# Altium PCB iMX6 Rex_V1I1_PCB.PcbDoc (part 6 of 8)
Units mm, origin at the board's own origin, x right, y up, seen from the top; angles counter-clockwise.
Board outline 70 x 40 mm, 12 copper layers (L1, L2, L3, L4, L5 (PWR), L6 (PWR), L7 (PWR), L8 (PWR), L9, L10, L11, L12), stack 1.566 mm thick; 473 components, 409 nets, 2294 pads, 1880 vias.
Unrouted connection lines stored in the file: 7.
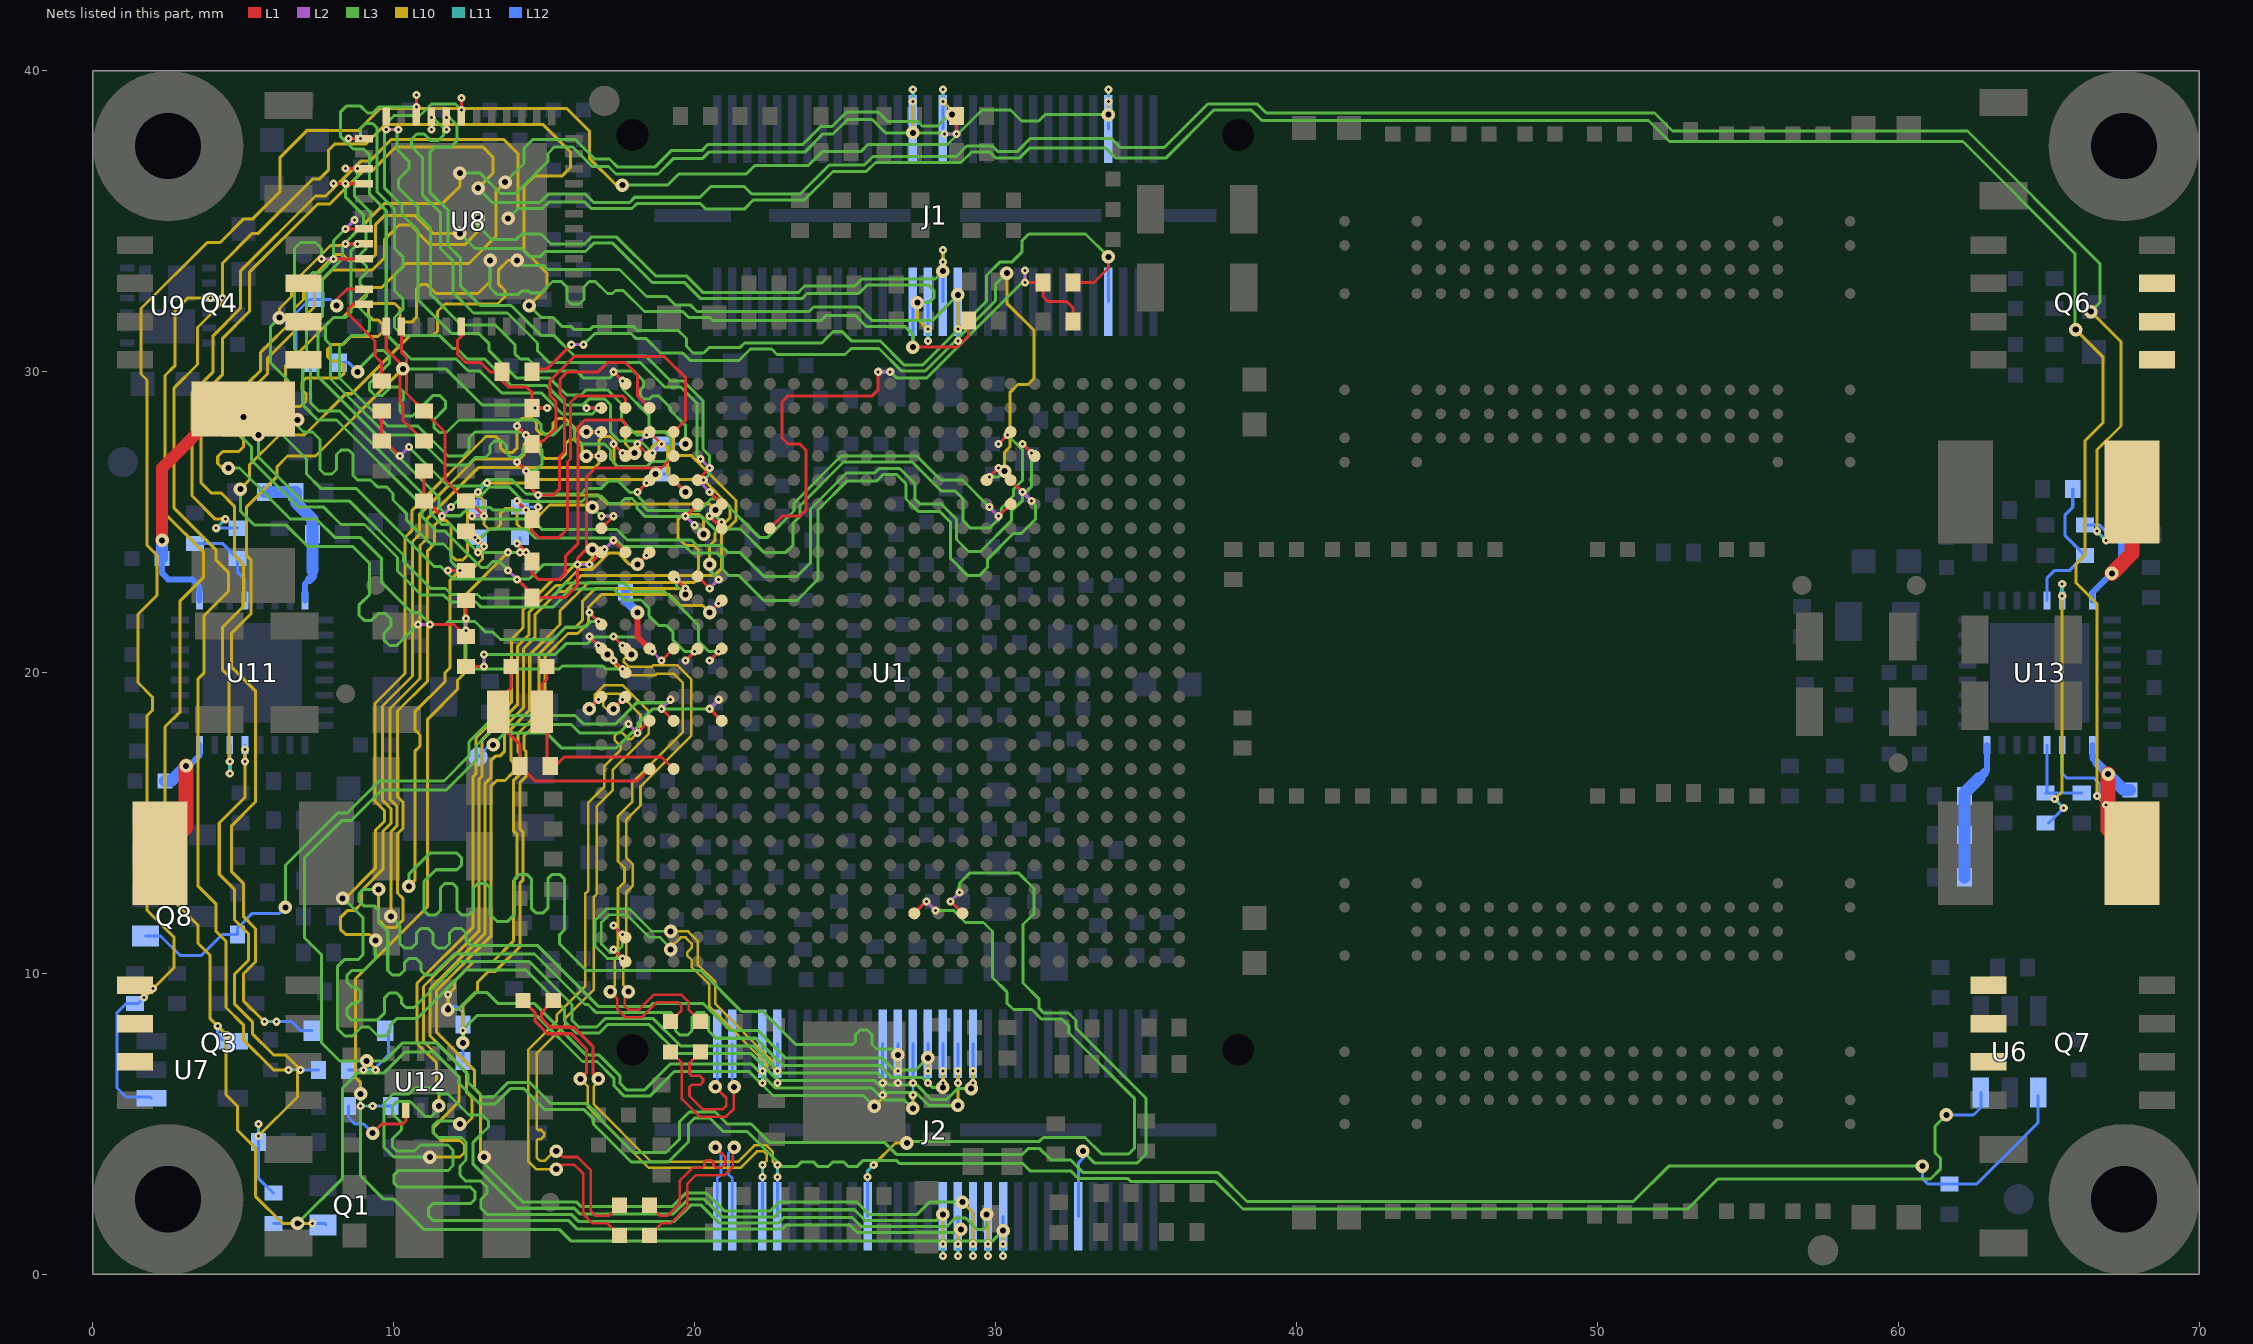
[diagram p16: the nets of this part, all layers, seen from the top]

## Via types
v1: diameter 0.45, hole 0.2, L1 to L12, tented both sides, 761 vias
v2: diameter 0.27, hole 0.1, L1 to L2, 305 vias
v3: diameter 0.27, hole 0.1, L2 to L3, 290 vias
v4: diameter 0.45, hole 0.2, L3 to L10, 196 vias
v5: diameter 0.27, hole 0.1, L11 to L12, 185 vias
v6: diameter 0.27, hole 0.1, L10 to L11, 142 vias
v7: diameter 0.45, hole 0.2, L3 to L10, tented both sides, 1 vias

## Nets (pads, with @x,y where several pads share a name; then routed paths per layer and width w, separated by ;. In a path a pad name is that pad's centre, name@x,y a point inside that pad or via, vN(x,y) a via of type N, cw(c..) or ccw(c..) an arc to the next point about the centre after c; other vN are vias at no path point) (continued)
PCIE_RX_N: J2.52 U1.B1 | length 14.1
  L1 w0.101: v2(17.3,10.8) U1.B1@17.7,10.4
  L2 w0.1: v2(17.3,10.8) v3(17.6,10.5)
  L3 w0.085: v3(17.6,10.5) 17.1,10.5 16.7,10.9 16.7,11.783 17.067,12.15 17.833,12.15 18.583,11.4 v4(19.2,11.4)
  L10 w0.085: v4(19.2,11.4) 19.783,11.4 20.103,11.08 20.103,10.3 20.688,9.715 20.688,8.993 22.612,7.068 22.612,6.895 v6(22.75,6.758)
  L11 w0.1: v5(22.75,6.358) v6(22.75,6.758)
  L12 w0.101: v5(22.75,6.358) J2.52@22.75,7.67
PCIE_RX_P: J2.54 U1.B2 | length 14.1
  L1 w0.101: v2(17.3,11.6) U1.B2@17.7,11.2
  L2 w0.1: v2(17.3,11.6) v3(17.6,11.3)
  L3 w0.085: v3(17.6,11.3) 17.6,10.914 17.386,10.7 17.183,10.7 16.9,10.983 16.9,11.7 17.15,11.95 17.75,11.95 18.5,11.2 18.85,11.2 19.2,10.85 v4(19.2,10.8)
  L10 w0.085: v4(19.2,10.8) 19.2,10.859 19.541,11.2 19.7,11.2 19.9,11 19.9,10.853 19.75,10.703 19.75,10.6 19.903,10.447 19.903,10.217 20.488,9.632 20.488,8.91 22.412,6.985 22.412,6.92 v6(22.25,6.758)
  L11 w0.1: v5@22.25,6.358 v6(22.25,6.758)
  L12 w0.101: v5@22.25,6.358 J2.54@22.25,7.67
  other v5: 22.25,6.358
PCIE_TX_N: C63.2 J2.51 | length 14.2
  L1 w0.101: C63.2@15.3,9.1 14.915,8.715 14.915,8.5 15.2,8.215 15.985,8.215 16.615,7.585 16.615,6.685 v1(16.8,6.5)
  L10 w0.085: v1(16.8,6.5) 16.8,6.4 16.641,6.241 16.641,5.659 18.557,3.743 21.438,3.743 21.984,4.289 22.381,4.289 22.6,4.07 22.6,3.743 22.7,3.643 v6(22.75,3.643)
  L11 w0.1: v5(22.75,3.243) v6(22.75,3.643)
  L12 w0.101: J2.51@22.75,1.93 v5(22.75,3.243)
PCIE_TX_P: C65.2 J2.53 | length 14.2
  L1 w0.101: C65.2@14.3,9.1 14.7,8.7 14.7,8.411 15.111,8 15.896,8 16.4,7.496 16.4,6.7 v1(16.2,6.5)
  L10 w0.085: v1(16.2,6.5) 16.441,6.259 16.441,5.576 18.475,3.542 21.52,3.542 22.066,4.089 22.299,4.089 22.4,3.987 22.4,3.793 v6(22.25,3.643)
  L11 w0.1: v5(22.25,3.243) v6(22.25,3.643)
  L12 w0.101: J2.53@22.25,1.93 v5(22.25,3.243)
PCIE_WAKE: J2.39 U1.P3 | length 24.3
  L1 w0.1: U1.P3@27.3,12 v2(27.7,12.4)
  L2 w0.1: v2(27.7,12.4) v3(28,12.1)
  L3 w0.1: v4(27.05,4.368) 27.107,4.425 31.455,4.425 31.585,4.555 32.975,4.555 33.53,4 34.425,4 34.625,4.2 34.625,5.835 32.438,8.023 32.438,8.251 32.196,8.493 31.522,8.493 31.209,8.805 30.595,8.805 30.375,9.025 30.375,9.395 29.9,9.87 29.9,11.4 29.6,11.7 29,11.7 28.6,12.1 v3(28,12.1)
  L10 w0.1: v6(25.95,3.643) 26.676,4.368 v4(27.05,4.368)
  L11 w0.1: v5(25.75,3.243) 25.75,3.443 v6(25.95,3.643)
  L12 w0.1: J2.39@25.75,1.93 v5(25.75,3.243)
PHASE1_2V5: C230.1 L4.2 Q6.5 Q6.6 Q6.7 U13.16 | length 6.7
  L1 w0.5: v1(67.1,23.3) 67.769,23.969 L4.2@67.769,26
  L12 w0.2: U13.16@66.45,22.4 66.45,22.65 v1(67.1,23.3) ; 67.4,23.6 67.4,24.5 C230.1@67.5,24.6
  L12 w0.4: v1(67.1,23.3) 67.4,23.6 67.5,23.7 C230.1@67.5,24.6
PHASE1_3V3: C211.1 L1.2 Q3.5 Q3.6 Q3.7 U11.16 | length 5.1
  L1 w0.5: L1.2@2.231,14 3.1,14.869 v1(3.1,16.9)
  L12 w0.2: v1(3.1,16.9) 3.2,16.9 3.55,17.25 U11.16@3.55,17.6
  L12 w0.4: C211.1@2.4,16.4 2.6,16.4 v1(3.1,16.9)
PHASE2_1V5: C231.2 L5.1 Q7.5 Q7.6 Q7.7 U13.25 | length 5.1
  L1 w0.5: v1(66.975,16.625) 66.975,14.794 L5.1@67.769,14
  L12 w0.2: U13.25@66.45,17.6 66.45,17.15 66.6,17
  L12 w0.3: 66.6,17 v1(66.975,16.625)
  L12 w0.4: v1(66.975,16.625) 67.5,16.1 C231.2@67.7,16.1
PHASE2_1V375: C212.2 L2.1 Q4.5 Q4.6 Q4.7 U11.25 | length 8.9
  L1 w0.4: v1(2.3,24.4) 2.3,26.8 4.269,28.769 L2.1@5,28.769
  L12 w0.2: C212.2@2.3,23.8 2.3,23.3 2.5,23.1 3.3,23.1 3.55,22.85 U11.25@3.55,22.4
  L12 w0.4: C212.2@2.3,23.8 v1(2.3,24.4)
PMIC_ON_REQ: Q8.1 R73.1 U1.D11 | length 23.7
  L1 w0.1: v2(18.9,18.8) U1.D11@19.3,18.4
  L2 w0.1: v2(18.9,18.8) v3(19.2,19.1)
  L3 w0.1: v1(6.4,12.2) 6.4,13.6 8.13,15.33 8.447,15.33 9.517,16.4 11.666,16.4 12.5,17.234 12.5,17.7 13.375,18.575 16.025,18.575 16.3,18.3 17.375,18.3 18.075,19 19.1,19 v3(19.2,19.1)
  L12 w0.1: Q8.1@1.75,11.25 2.25,11.25 2.9,10.6 3.6,10.6 4.3,11.3 R73.1@4.8,11.3 4.8,11.5 5.3,12 6.2,12 v1(6.4,12.2)
PMIC_STBY_REQ: TP3.1 U1.F11 | length 10.2
  L1 w0.1: v2(20.5,18.8) U1.F11@20.9,18.4
  L2 w0.1: v2(20.5,18.8) v3(20.8,19.1)
  L3 w0.1: v1(13.3,17.6) 13.7,18 15.07,18 15.57,17.5 17.403,17.5 18.125,18.222 18.125,18.321 18.604,18.8 v2(20.5,18.8) v3(20.8,19.1)
  L12 w0.1: TP3.1@12.8,17.2 13.2,17.6 v1(13.3,17.6)
POK_1V5: R164.1 U13.14 | length 8.9
  L10 w0.1: v6(65.2,15.8) 65.45,16.05 v6(65.45,22.55)
  L11 w0.1: v6(65.2,15.8) v5(65.5,15.5) ; v6(65.45,22.55) v5(65.45,22.95)
  L12 w0.1: R164.1@65,15 v5(65.5,15.5) ; U13.14@65.45,22.4 v5(65.45,22.95)
POK_1V5_R: R154.1 R164.2 U13.28 | length 2.8
  L12 w0.1: U13.28@64.95,17.6 64.95,16.05 R164.2@64.9,16 R154.1@66.1,16
POK_1V375: R108.1 U13.27 | length 103.1
  L3 w0.1: v4(13.8,35.1) 14.125,35.425 14.938,35.425 15.163,35.65 16.337,35.65 16.562,35.425 17.921,35.425 18.096,35.6 20.18,35.6 20.375,35.405 21.649,35.405 21.949,35.705 23.645,35.705 24.595,36.655 25.707,36.655 26.007,36.955 28.855,36.955 29.2,37.3 29.817,37.3 30.017,37.1 30.786,37.1 31.116,37.43 33.67,37.43 34,37.1 35.655,37.1 37.255,38.7 38.5,38.7 38.85,38.35 51.7,38.35 52.4,37.65 62.15,37.65 65.875,33.925 65.875,31.425 v4(65.9,31.4)
  L10 w0.1: v6(4.4,25.1) 4.07,25.1 3.3,25.87 3.3,29.3 4,30 4,31.2 4.9,32.1 4.9,33.338 7.4,35.838 7.738,35.838 8.9,37 9.2,37 9.925,37.725 13.65,37.725 14.125,37.25 14.125,35.425 v4(13.8,35.1) ; v4(65.9,31.4) 66.8,30.5 66.8,28.3 66.2,27.7 66.2,23.9 65.9,23.6 65.9,23 66.6,22.3 v6(66.6,15.9)
  L11 w0.1: v5(4.1,24.8) v6(4.4,25.1) ; v6(66.6,15.9) v5(66.9,15.6)
  L12 w0.1: v5@4.2,24.8 R108.1@4.8,24.8 ; U13.27@65.45,17.6 65.45,16.65 65.6,16.5 66.5,16.5 66.7,16.3 66.7,15.8 v5(66.9,15.6)
POK_1V375_R: R108.2 R130.1 U11.28 | length 3.1
  L12 w0.1: R130.1@3.4,24.3 4.3,24.3 R108.2@4.8,23.8 4.8,23.35 5.05,23.1 U11.28@5.05,22.4
POK_2V5: R163.1 U11.14 | length 100.4
  L3 w0.1: v4(12.8,36.1) 13.275,35.625 14.855,35.625 15.13,35.9 16.37,35.9 16.645,35.625 17.838,35.625 18.013,35.8 20.177,35.8 20.532,36.155 21.65,36.155 21.9,35.905 23.505,35.905 24.475,36.875 25.644,36.875 25.924,37.155 28.7,37.155 29.045,37.5 29.9,37.5 30.085,37.315 30.718,37.315 31.153,37.75 33.85,37.75 34.145,37.455 35.61,37.455 37.055,38.9 38.7,38.9 39,38.6 51.9,38.6 52.5,38 62.3,38 66.7,33.6 66.7,32.3 v4(66.4,32)
  L10 w0.1: v6(4.55,17.05) 4.525,17.075 4.525,19.875 4.3,20.1 4.3,21.5 5,22.2 5,23.601 4.7,23.901 4.7,25.53 4.255,25.975 3.925,25.975 3.6,26.3 3.6,29.2 4.3,29.9 4.3,31.1 5.2,32 5.2,33.305 7.47,35.575 7.875,35.575 9,36.7 9.3,36.7 10.075,37.475 12.955,37.475 13.3,37.13 13.3,36.6 v4(12.8,36.1) ; v4(66.4,32) 67.4,31 67.4,28.2 66.6,27.4 v6(66.6,24.7)
  L11 w0.1: v5(4.55,16.65) v6(4.55,17.05) ; v6(66.6,24.7) v5(66.9,24.4)
  L12 w0.1: v5(4.55,16.65) U11.14@4.55,17.6 ; R163.1@66.2,24.9 66.7,24.9 66.9,24.7 v5(66.9,24.4)
POK_2V5_R: R153.1 R163.2 U13.13 | length 4.9
  L12 w0.1: U13.13@64.95,22.4 64.95,23.15 65.203,23.403 65.703,23.403 R163.2@66.2,23.9 65.55,24.55 65.55,25.25 65.8,25.5 R153.1@65.8,26.1
POK_3V0_SNVS: R93.1 U12.7 | length 3
  L1 w0.1: v1(9.3,4.7) 9.6,5 10.3,5 10.4,5.1 U12.7@10.4,5.45
  L12 w0.1: R93.1@8.5,5.6 8.5,5.2 8.7,5 9,5 v1(9.3,4.7)
POK_3V3: Q1.1 R107.1 U6.3 U7.4 U9.9 | length 107.3
  L3 w0.1: v4(6.8,1.7) 8.3,3.2 8.3,6.2 8.8,6.7 9.683,6.7 10.383,7.4 11.33,7.4 12.175,6.555 12.175,6.345 12.85,5.67 13.37,5.67 13.875,6.175 14.325,6.175 15.025,5.475 16.33,5.475 16.63,5.175 16.63,5 17.885,3.745 19.128,3.745 19.8,4.417 19.8,5 20,5.2 20.5,5.2 20.95,4.75 21.744,4.75 22.901,3.593 23.405,3.593 23.555,3.743 23.945,3.743 24.095,3.593 24.445,3.593 24.595,3.743 24.945,3.743 25.095,3.593 25.405,3.593 25.606,3.794 ; 25.607,3.793 26.7,3.793 26.8,3.693 30.894,3.693 31.145,3.443 32.5,3.443 32.76,3.183 34.4,3.183 34.5,3.083 37.317,3.083 38.225,2.175 53.005,2.175 54.005,3.175 54.2,3.175 61.075,3.175 61.4,3.5 61.4,3.87 61.225,4.045 61.225,4.925 v1(61.6,5.3)
  L10 w0.1: v6(3.91,32.45) 3.15,32.45 2.725,32.025 2.725,30.2 2.4,29.875 2.4,25.283 3.683,24 3.683,23.174 2.9,22.391 2.9,18.7 2.4,18.2 2.4,12.7 3.5,11.6 3.5,11 3.9,10.6 3.9,8.5 v6(4.45,7.95) 4.425,7.925 4.425,5.975 4.8,5.6 4.8,4.8 5.4,4.2 5.4,2.6 6.3,1.7 v4(6.8,1.7) v6(7.3,1.7)
  L11 w0.1: v6(3.91,32.45) v5(4.31,32.45) ; v5(4.15,8.25) v6(4.45,7.95) ; v5(6.9,1.7) v6(7.3,1.7)
  L12 w0.1: U9.9@3.86,32.45 v5(4.31,32.45) ; v5(4.15,8.25) 4.15,7.95 U7.4@4.3,7.8 ; R107.1@6,1.7 7.7,1.7 Q1.1@7.75,1.65 ; v1(61.6,5.3) 62.5,5.3 62.75,5.55 U6.3@62.75,6.05
POK_3V3_R: R107.2 R129.1 U11.13 | length 19.3
  L10 w0.1: v6(5.05,17.45) 5.05,15.85 4.2,15 4.2,13.3 4.7,12.8 4.7,11.8 5.175,11.325 5.175,10.445 4.7,9.97 4.7,8.997 5.3,8.397 5.3,8 6,7.3 6.403,7.3 6.8,6.903 6.8,5.9 v6(5.5,4.6)
  L11 w0.1: v5(5.05,17.05) v6(5.05,17.45) ; v6(5.5,4.6) v5(5.5,5)
  L12 w0.1: v5(5.05,17.05) U11.13@5.05,17.6 ; v5(5.5,5) R129.1@5.5,4.4 5.5,3.2 R107.2@6,2.7
POR_BN: D1.1 R60.1 R70.1 U1.C11 U6.1 | length 88.3
  L1 w0.1: v2(18.1,18) U1.C11@18.5,18.4
  L2 w0.1: v3(17.8,18.3) v2(18.1,18)
  L3 w0.1: v3(17.8,18.3) 17.5,18 16.175,18 15.9,18.275 13.445,18.275 12.75,17.58 12.75,17.101 11.749,16.1 9.6,16.1 8.58,15.08 8.267,15.08 7.025,13.838 7.025,11.2 7.6,10.625 7.6,7.7 8.2,7.1 v4(9.1,7.1) 9.7,7.1 10.3,7.7 11.413,7.7 12.475,6.638 12.475,6.378 12.953,5.9 13.317,5.9 13.792,6.375 14.525,6.375 15.225,5.675 16.413,5.675 16.83,5.258 16.83,5.183 17.963,4.05 19.05,4.05 19.5,4.5 19.5,5.083 19.817,5.4 20.683,5.4 21.083,5 21.877,5 22.5,4.377 26.316,4.377 26.7,3.993 30.893,3.993 31.093,4.193 31.455,4.193 31.848,3.8 32.5,3.8 32.918,3.383 37.4,3.383 38.358,2.425 51.195,2.425 52.37,3.6 v1(60.8,3.6)
  L10 w0.1: v4(9.1,7.1) v6(9.4,6.8)
  L11 w0.1: v5(9,6.8) v6(9.4,6.8)
  L12 w0.1: R70.1@8.5,6.8 v5(9,6.8) 9.325,6.8 9.819,7.294 D1.1@9.819,8.1 ; v1(60.8,3.6) 60.8,3.4 60.8,3.2 61,3 61.2,3 R60.1@61.7,3 62.6,3 64.65,5.05 U6.1@64.65,5.95
REFIN2_1V5: R134.1 R135.1 R158.2 U13.32 | length 4.7
  L12 w0.2: 62.875,16.675 62.95,16.75 U13.32@62.95,17.6
  L12 w0.3: 62.7,16.5 62.875,16.675
  L12 w0.4: R158.2@62.2,13.2 R134.1@62.2,14.6 R135.1@62.2,15.9 62.2,16 62.7,16.5
REFIN2_1V375: R119.1 R120.2 R136.2 U11.32 | length 5.5
  L12 w0.2: U11.32@7.05,22.4 7.05,22.95 7.2,23.1 ; R120.2@7.3,24.6 7.3,25.1
  L12 w0.3: 7.2,23.1 7.3,23.2 7.3,23.4
  L12 w0.4: R136.2@5.7,26 R119.1@6.75,26 6.75,25.65 7.3,25.1 R120.2@7.3,24.6 7.3,23.4
RGMII_INT: R88.2 R89.1 U1.W22 U8.38 | length 35
  L1 w0.1: U8.38@10.25,31.51 10.25,30.65 10.425,30.475 10.425,29.275 R89.1@11,28.7 11.7,28 11.7,26.4 R88.2@12.4,25.7 12.5,25.7 v2(13,25.2) ; v2(30.9,27.6) U1.W22@31.3,27.2
  L2 w0.1: v3(12.6,25.2) v2(13,25.2) ; v2(30.9,27.6) v3(31.2,27.3)
  L3 w0.1: v3(12.6,25.2) 12.7,25.1 14.583,25.1 14.933,24.75 17.42,24.75 17.755,24.415 19.885,24.415 20.075,24.225 20.875,24.225 21.1,24 21.5,24 22.3,23.2 23.4,23.2 23.85,23.65 23.85,25.436 25.05,26.636 25.986,26.636 26.135,26.785 26.815,26.785 27.325,26.275 27.325,25.775 27.5,25.6 28.2,25.6 28.7,25.1 28.7,24.425 29.1,24.025 29.5,24.025 30.525,25.05 30.525,25.355 30.9,25.73 30.9,25.892 31.2,26.193 v3(31.2,27.3)
RGMII_INT_R: R88.1 U1.V21 | length 29.2
  L1 w0.1: R88.1@12.4,24.7 12.5,24.7 v2(13,24.2) ; U1.V21@30.5,26.4 v2(30.9,26)
  L2 w0.1: v3(12.7,24.5) v2(13,24.2) ; v2(30.9,26) v3(31.2,25.7)
  L3 w0.1: v3(12.7,24.5) 12.925,24.5 13.2,24.775 14.4,24.775 14.7,24.475 17.325,24.475 17.615,24.185 19.7,24.185 19.91,23.975 20.755,23.975 20.925,23.805 20.925,23.445 21.145,23.225 21.475,23.225 22.3,22.4 23.4,22.4 24.1,23.1 24.1,25.403 25.072,26.375 26.058,26.375 26.268,26.585 26.718,26.585 27.025,26.278 27.025,25.775 27.45,25.35 28.153,25.35 28.5,25.003 28.5,23.8 29.075,23.225 29.455,23.225 29.725,23.495 29.725,23.755 30.6,24.63 30.861,24.63 31.325,25.095 31.325,25.575 v3(31.2,25.7)
RGMII_MDC: R85.1 R87.1 U1.V20 | length 26.8
  L1 w0.1: R85.1@9.6,28.8 R85.1@9.6,28.7 R87.1@9.6,27.7 9.7,27.7 v2(10.2,27.2) ; v2(30.1,25.2) U1.V20@30.5,25.6
  L2 w0.1: v2(10.2,27.2) v3(10.5,27.5) ; v3(29.8,25.5) v2(30.1,25.2)
  L3 w0.1: v3(10.5,27.5) 11.8,26.2 12.875,26.2 13.1,26.425 13.908,26.425 14.398,25.935 16.222,25.935 16.412,26.125 16.895,26.125 17.145,26.375 17.455,26.375 17.845,25.985 18.001,25.985 18.285,25.701 18.285,25.545 18.445,25.385 20.155,25.385 20.545,25.775 20.875,25.775 22.15,24.5 22.425,24.5 23.3,25.375 23.3,25.633 24.867,27.2 27.383,27.2 28.183,26.4 28.9,26.4 v3(29.8,25.5)
RGMII_MDIO: R86.1 R162.1 U1.V23 | length 29.7
  L1 w0.1: R86.1@11,26.7 11,25.8 v2(11.6,25.2) ; v2(30.1,27.6) U1.V23@30.5,28
  L2 w0.1: v2(11.6,25.2) v3(11.9,25.5) ; v2(30.1,27.6) v3(30.4,27.9)
  L3 w0.1: v3(11.9,25.5) 12.3,25.9 12.908,25.9 13.183,26.175 13.825,26.175 14.315,25.685 16.255,25.685 16.445,25.875 16.895,25.875 17.145,25.625 17.522,25.625 17.682,25.785 17.918,25.785 18.085,25.618 18.085,25.463 18.362,25.185 20.245,25.185 20.715,24.715 21.018,24.715 21.078,24.775 21.525,24.775 22.3,24 23.03,24 23.275,24.245 23.275,24.975 23.5,25.2 23.5,25.55 24.95,27 27.23,27 28.2,26.03 28.67,26.03 28.925,25.775 28.925,25.045 29.17,24.8 29.8,24.8 30.2,25.2 30.2,25.475 30.6,25.875 30.6,26.1 30.9,26.4 30.9,27.4 v3(30.4,27.9)
RGMII_R_MDC: R85.2 U8.36 | length 3.4
  L1 w0.1: U8.36@9.01,32.25 8.65,32.25 8.5,32.1 8.5,31.9 9.375,31.025 9.375,30.525 9.6,30.3 R85.2@9.6,29.7
RGMII_R_MDIO: R86.2 U8.37 | length 4.3
  L1 w0.1: U8.37@9.75,31.51 9.75,30.75 10.2,30.3 10.2,29 10.3,28.9 10.3,28.4 R86.2@11,27.7
RGMII_R_RXCLK: R83.2 R101.2 U8.35 | length 4.8
  L1 w0.1: v1(8.1,32.2) 8.1,32.4 8.45,32.75 U8.35@9.01,32.75
  L12 w0.1: R83.2@7.2,30.3 7.1,30.3 6.75,30.65 6.75,31.95 7.2,32.4 R101.2@7.4,32.4 7.9,32.4 v1(8.1,32.2)
RGMII_R_TXCLK: R35.1 U1.D21 | length 1.6
  L1 w0.1: U1.D21@19.3,26.4 v1(19.7,26)
  L12 w0.1: R35.1@18.9,26.6 19.1,26.6 v1(19.7,26)
RGMII_RSTN: D1.2 R65.2 R75.1 U8.42 | length 38.3
  L1 w0.1: U8.42@12.25,31.51 12.25,31.18 12.125,31.055 12.125,30.575 12.4,30.3 12.9,30.3 13.2,30 R65.2@13.6,30 13.6,29.7 13.8,29.5 14.4,29.5 14.6,29.3 R75.1@14.6,28.9 ; R75.1@14.6,28.8 v2(15.1,28.8)
  L2 w0.1: v3(14.7,28.8) v2(15.1,28.8)
  L3 w0.1: v4(10.3,30.1) 11.73,30.1 12.93,28.9 14.6,28.9 v3(14.7,28.8)
  L10 w0.1: v6(5.7,8.4) 5,9.1 5,9.987 5.4,10.387 5.4,11.5 5,11.9 5,13 4.6,13.4 4.6,14.9 5.4,15.7 5.4,19.4 4.6,20.2 4.6,21.3 5.25,21.95 5.25,23.75 5.1,23.9 5.1,25.5 6.125,26.525 6.125,26.855 6.47,27.2 7.4,27.2 v4(10.3,30.1)
  L11 w0.1: v6(5.7,8.4) v5(6.1,8.4)
  L12 w0.1: v5(6.1,8.4) 6.6,8.4 6.9,8.1 D1.2@7.281,8.1
RGMII_RSTN_R: R65.1 U1.U21 | length 28.1
  L1 w0.1: R65.1@14.6,30.1 15.1,30.1 15.5,30.5 v2(15.9,30.9) ; U1.U21@29.7,26.4 v2(30.1,26.8)
  L2 w0.1: v2(15.9,30.9) v3(16.3,30.9) ; v3(29.8,26.5) v2(30.1,26.8)
  L3 w0.1: v3(16.3,30.9) 16.675,31.275 17.884,31.275 18.059,31.1 18.387,31.1 18.862,30.625 19.6,30.625 19.85,30.375 21.475,30.375 21.855,30.755 22.56,30.755 22.74,30.575 25,30.575 25.2,30.775 26.128,30.775 26.886,30.018 27.655,30.018 30,32.363 30,32.905 v4(30.375,33.28) ; v3(29.8,26.5) 30.1,26.5 v4(30.3,26.7)
  L10 w0.1: v4(30.3,26.7) 30.3,27.325 30.475,27.5 30.475,29.305 30.745,29.575 31.075,29.575 31.275,29.775 31.275,31.38 30.375,32.28 v4(30.375,33.28)
RGMII_RXCLK: R83.1 U1.B25 | length 22.7
  L1 w0.1: v2(17.3,30) U1.B25@17.7,29.6
  L2 w0.1: v2(17.3,30) v3(17.6,29.7)
  L3 w0.1: v1(8.8,30) 8.8,30.07 9.43,30.7 9.674,30.7 9.85,30.523 9.85,30.28 9.2,29.63 9.2,29.386 9.377,29.21 9.62,29.21 9.91,29.5 10.154,29.5 10.33,29.323 10.33,29.08 10.2,28.95 10.2,28.706 10.377,28.53 10.62,28.53 11.295,29.205 11.538,29.205 11.715,29.028 11.715,28.785 11.33,28.4 11.33,28.157 11.507,27.98 11.75,27.98 12.17,28.4 14.75,28.4 14.9,28.25 14.9,28.05 15.05,27.9 15.3,27.9 15.65,28.25 15.85,28.25 16,28.1 16,27.735 16.135,27.6 17,27.6 17.2,27.4 17.2,27.1 17.45,26.85 18.42,26.85 18.585,27.015 19.015,27.015 19.2,27.2 19.2,27.8 19,28 18.703,28 18.475,28.228 18.475,28.555 17.6,29.43 v3(17.6,29.7)
  L12 w0.1: R83.1@8.2,30.3 8.5,30.3 v1(8.8,30)
RGMII_RXD0: R98.1 U1.C24 U8.32 | length 27.4
  L1 w0.1: v2(8.4,34.25) U8.32@9.01,34.25 ; v2(14.1,27) 14.6,26.5 14.6,26.1 14.8,25.9 15.3,25.9 15.5,26.1 15.5,27.17 15.675,27.345 15.675,29.1 15.525,29.25 15.525,29.755 15.77,30 16.8,30 17.1,30.3 17.7,30.3 18.1,29.9 18.1,29.2 U1.C24@18.5,28.8
  L2 w0.1: v2(8.4,34.25) v3(8.8,34.25) ; v2(14.1,27) v3(14.4,26.7)
  L3 w0.1: v3(8.8,34.25) 8.575,34.025 8.575,31.975 8.4,31.8 8,31.8 7.725,31.525 7.725,31.075 7.9,30.9 7.9,29.763 9.763,27.9 10.7,27.9 11.7,26.9 12.45,26.9 12.7,27.15 13.05,27.15 13.2,27.3 13.2,27.55 13.35,27.7 13.6,27.7 13.75,27.55 13.75,27.3 13.9,27.15 14.15,27.15 14.3,27.3 14.3,27.45 14.45,27.6 14.725,27.6 14.925,27.4 14.925,26.925 14.715,26.715 14.415,26.715 v3(14.4,26.7)
RGMII_RXD1: R97.1 U1.B23 U8.31 | length 27.4
  L1 w0.1: v2(8.4,34.75) U8.31@9.01,34.75 ; v2(14.1,24.3) 14.6,23.8 R97.1@14.6,23.7 14.6,23.3 14.8,23.1 15.5,23.1 15.7,23.3 15.7,23.87 16.115,24.285 16.115,28.157 16.358,28.4 17.6,28.4 17.7,28.3 U1.B23@17.7,28
  L2 w0.1: v2(8.4,34.75) v3(8.7,35.05) ; v2(14.1,24.3) v3(14.4,24)
  L3 w0.1: v3(8.7,35.05) 8,34.35 8,33.747 7.553,33.3 7.3,33.3 7.1,33.1 7.1,30.721 7.225,30.596 7.225,28.975 7.5,28.7 8.2,28.7 11.217,25.683 11.217,25.3 11.6,24.917 11.88,24.917 12.797,24 v3(14.4,24)
RGMII_RXD2: R96.1 U1.B24 U8.28 | length 27.4
  L1 w0.1: v2(8,36.25) U8.28@9.01,36.25 ; v2(14.1,25.7) 14.6,25.2 R96.1@14.6,25.1 14.6,24.7 14.8,24.5 15.5,24.5 15.775,24.775 15.775,27 15.875,27.1 15.875,28.975 16.1,29.2 17.6,29.2 17.7,29.1 U1.B24@17.7,28.8
  L2 w0.1: v2(8,36.25) v3(8.4,36.25) ; v2(14.1,25.7) v3(14.4,25.4)
  L3 w0.1: v3(8.4,36.25) 8.4,35.8 9,35.2 9,34.9 8.3,34.2 8.3,33.764 7.636,33.1 7.636,31.861 7.475,31.7 7.475,29.855 11.5,25.83 11.5,25.497 11.782,25.215 12.212,25.215 12.482,25.485 13.215,25.485 13.3,25.4 v3(14.4,25.4)
RGMII_RXD3: R95.1 U1.D23 U8.27 | length 28.3
  L1 w0.1: v2(8.4,36.75) U8.27@9.01,36.75 ; v2(14.1,28.2) 14.6,27.7 R95.1@14.6,27.6 R95.1@14.65,27.65 ; R95.1@14.7,27.6 R95.1@14.65,27.65 ; U1.D23@19.3,28 19.7,28.4 19.7,29.8 19,30.5 15.987,30.5 15.2,29.713 15.2,29.203 15.385,29.018 15.385,28.115 14.97,27.7 14.7,27.7 R95.1@14.65,27.65
  L2 w0.1: v2(8.4,36.75) v3(8.8,36.75) ; v2(14.1,28.2) v3(14.4,27.9)
  L3 w0.1: v3(8.8,36.75) 8.8,36.5 8.7,36.4 8.7,35.825 9.225,35.3 9.225,34.8 9.085,34.66 9.085,34.1 8.875,33.89 8.875,33.725 9.1,33.5 9.1,33.3 8.875,33.075 8.875,32.925 9.1,32.7 9.1,32.525 8.875,32.3 8.875,32.1 9.2,31.775 9.2,31.4 9,31.2 8.575,31.2 8.2,30.825 8.2,29.796 9.796,28.2 10.8,28.2 11.8,27.2 12.3,27.2 12.5,27.4 12.5,27.8 12.7,28 14.3,28
RGMII_RXDV: R91.1 U1.D22 U8.33 | length 27.4
  L1 w0.1: v2(8,33.75) U8.33@9.01,33.75 ; v2(14.1,23.1) 14.7,22.5 15.7,22.5 16.1,22.9 16.1,23.8 16.4,24.1 16.4,26.5 16.7,26.8 18.9,26.8 U1.D22@19.3,27.2
  L2 w0.1: v3(7.6,33.75) v2(8,33.75) ; v3(13.8,23.4) v2(14.1,23.1)
  L3 w0.1: v3(7.6,33.75) 7.6,34.1 7.4,34.3 6.9,34.3 6.7,34.1 6.7,30.763 6.975,30.488 6.975,28.9 7.475,28.4 8.1,28.4 10.934,25.566 10.934,25.2 11.434,24.7 11.7,24.7 12.9,23.5 13.1,23.5 13.3,23.7 13.5,23.7 v3(13.8,23.4)
RGMII_TXCLK: R35.2 U8.24 | length 19.7
  L1 w0.1: v2(9.75,38.05) U8.24@9.75,38.49
  L2 w0.1: v2(9.75,38.05) v3(10.15,38.05)
  L3 w0.1: v3(10.15,38.05) 10.1,38 10.1,37.4 10.5,37 10.5,36.737 10.15,36.387 10.15,36.125 10.8,35.475 10.8,35.2 11.225,34.775 11.225,32.575 12.237,31.562 13.368,31.562 14.025,30.905 14.025,30.6 14.2,30.425 14.475,30.425 14.88,30.02 16.08,30.02 16.3,29.8 17.18,29.8 17.4,30.02 17.98,30.02 18.3,29.7 18.3,29.5 18.2,29.4 18.2,29.2 18.3,29.1 18.5,29.1 18.6,29.2 18.8,29.2 19.197,28.803 19.197,28.711 19.7,28.208 v1(19.7,27.6)
  L12 w0.1: R35.2@18.9,27.6 v1(19.7,27.6)
RGMII_TXD0: U1.C22 U8.19 | length 21.2
  L1 w0.1: U8.19@12.25,38.49 v2(12.25,39.1) ; v2(18.1,27.6) U1.C22@18.5,27.2
  L2 w0.1: v3(12.25,38.7) v2(12.25,39.1) ; v2(18.1,27.6) v3(18.4,27.9)
  L3 w0.1: v3(12.25,38.7) 12.05,38.9 11.253,38.9 10.868,38.515 10.015,38.515 9.7,38.2 9.7,36.1 10.275,35.525 10.275,35.225 10.8,34.7 10.8,32.4 11.925,31.275 12.825,31.275 13.17,30.93 13.17,30.7 14.07,29.8 15.17,29.8 15.745,29.225 16.225,29.225 16.4,29.4 17.1,29.4 17.57,28.93 17.57,28.4 18.07,27.9 v3(18.4,27.9)
RGMII_TXD1: U1.F20 U8.20 | length 21.2
  L1 w0.1: v2(11.75,38.05) U8.20@11.75,38.49 ; v2(20.5,26) U1.F20@20.9,25.6
  L2 w0.1: v2(11.75,38.05) v3(11.75,38.45) ; v3(20.3,26.4) 20.3,26.2 v2(20.5,26)
  L3 w0.1: v3(11.75,38.45) 11.85,38.45 12.1,38.2 12.1,37.675 11.9,37.475 11.375,37.475 11.2,37.3 11.2,35.97 11.8,35.37 11.8,34.2 12.225,33.775 12.225,32.845 12.87,32.2 13.9,32.2 14.9,31.2 15.33,31.2 16.005,30.525 18.375,30.525 19.2,29.7 19.613,29.7 20.275,29.038 20.275,27.428 20.5,27.203 20.5,26.6 v3(20.3,26.4)
RGMII_TXD2: U1.E21 U8.21 | length 21.3
  L1 w0.1: v2(11.25,38.05) U8.21@11.25,38.49 ; U1.E21@20.1,26.4 v2(20.5,26.8)
  L2 w0.1: v2(11.25,38.05) v3(11.25,38.45) ; v3(20.2,27.1) v2(20.5,26.8)
  L3 w0.1: v3(11.25,38.45) 11.3,38.45 11.65,38.1 11.65,37.857 11.473,37.68 11.23,37.68 11.01,37.9 10.767,37.9 10.59,37.723 10.59,37.48 10.95,37.12 10.95,35.887 11.55,35.287 11.55,34.1 11.975,33.675 11.975,32.625 12.65,31.95 13.78,31.95 14.775,30.955 14.775,30.695 15.17,30.3 18.2,30.3 19,29.5 19.53,29.5 20.075,28.955 20.075,27.225 v3(20.2,27.1)
RGMII_TXD3: U1.A24 U8.22 | length 21.2
  L1 w0.1: U8.22@10.75,38.49 v2(10.75,39.2) ; v2(16.4,28.8) U1.A24@16.9,28.8
  L2 w0.1: v3(10.75,38.8) v2(10.75,39.2) ; v2(16.4,28.8) v3(16.8,28.8)
  L3 w0.1: v3(10.75,38.8) 9.5,38.8 9.3,38.6 9.125,38.6 8.9,38.825 8.425,38.825 8.225,38.625 8.225,37.825 8.65,37.4 9,37.4 9.2,37.2 9.2,35.9 9.75,35.35 9.75,31.25 10.575,30.425 12.079,30.425 12.479,30.025 12.858,30.025 13.583,29.3 14.9,29.3 15.6,28.6 16.6,28.6 v3(16.8,28.8)
RGMII_TXEN: U1.C23 U8.25 | length 21.2
  L1 w0.1: v2(8.5,37.75) U8.25@9.01,37.75 ; U1.C23@18.5,28 v2(18.9,27.6)
  L2 w0.1: v2(8.5,37.75) v3(8.9,37.75) ; v3(18.6,27.3) v2(18.9,27.6)
  L3 w0.1: v3(8.9,37.75) 8.9,38.1 9.05,38.25 9.3,38.25 9.45,38.1 9.45,35.975 10.025,35.4 10.025,34.1 10.3,33.825 10.3,33.475 10.025,33.2 10.025,32.7 10.3,32.425 10.3,32.075 10.025,31.8 10.025,31.475 10.3,31.2 11.53,31.2 11.961,30.77 12.1,30.77 12.445,30.425 13.024,30.425 13.899,29.55 15.067,29.55 15.717,28.9 16.3,28.9 16.5,29.1 17,29.1 17.2,28.9 17.2,28 17.5,27.7 18.197,27.7 18.597,27.3 v3(18.6,27.3)
RSTINN: J1.8 R68.1 U7.1 | length 70.8
  L3 w0.1: v4(17.6,36.2) 19.1,36.2 19.48,36.58 21.725,36.58 22,36.855 23.776,36.855 24.236,37.315 25.518,37.315 25.758,37.555 28.405,37.555 29.55,38.7 30.5,38.7 30.865,38.335 31.435,38.335 31.643,38.543 v4(33.75,38.543)
  L10 w0.1: v6(1.7,9.2) 2.7,10.2 2.7,11.2 1.8,12.1 1.8,18.57 1.975,18.745 1.975,19.195 1.5,19.67 1.5,21.939 2.13,22.57 2.13,23.9 1.8,24.23 1.8,29.725 1.6,29.925 1.6,32.1 3.8,34.3 4.23,34.3 5.015,35.085 5.315,35.085 6.225,35.995 6.225,37.125 7.125,38.025 8.825,38.025 9.55,38.75 15.75,38.75 16.5,38 16.5,37.1 17.4,36.2 v4(17.6,36.2) ; v4(33.75,38.543) v6(33.75,38.982)
  L11 w0.1: v6(1.7,9.2) v5(2,9.5) ; v6(33.75,38.982) v5(33.75,39.383)
  L12 w0.1: U7.1@1.95,5.85 1.9,5.9 1.1,5.9 0.8,6.2 0.8,8.7 1.1,9 R68.1@1.4,9 1.5,9 v5(2,9.5) ; J1.8@33.75,38.07 v5(33.75,39.383)
RSTOUTN: J1.7 R51.2 R70.2 | length 79.2
  L1 w0.1: R51.2@32.575,32.97 33.27,32.97 33.75,33.45 v1(33.75,33.82)
  L3 w0.1: v4(14.5,32.2) 14.9,31.8 15.3,31.8 15.6,31.5 15.9,31.5 16,31.4 16.517,31.4 16.617,31.5 17.975,31.5 18.1,31.375 19.455,31.375 19.725,31.105 19.725,30.845 19.945,30.625 20.3,30.625 20.475,30.8 21.5,30.8 21.655,30.955 24.22,30.955 24.595,31.33 24.905,31.33 25.205,31.03 26.156,31.03 26.968,30.218 27.572,30.218 29.7,32.346 29.7,33.2 30.155,33.655 30.555,33.655 30.875,33.975 30.875,34.349 31.107,34.58 32.99,34.58 v1(33.75,33.82)
  L10 w0.1: v6(6.5,6.8) 6,6.8 5,7.8 5,8.3 4.425,8.875 4.425,11.075 4.1,11.4 4.1,12.3 3.5,12.9 3.5,19.8 3.7,20 3.7,21.9 4.5,22.7 4.5,23.335 4.1,23.735 4.1,24.068 2.7,25.468 2.7,29.47 3.475,30.245 3.475,31.475 4.3,32.3 4.3,33.6 5.3,34.6 5.496,34.6 7.296,36.4 7.525,36.4 7.825,36.7 7.825,37.355 8.045,37.575 9.075,37.575 9.725,38.225 14.954,38.225 15.2,37.979 15.7,37.479 15.875,37.304 15.875,36.788 15.587,36.5 14.67,36.5 14.325,36.155 14.325,34.045 15.1,33.27 15.1,32.8 v4(14.5,32.2)
  L11 w0.1: v6(6.5,6.8) v5(6.9,6.8)
  L12 w0.1: v5(6.9,6.8) R70.2@7.5,6.8 ; J1.7@33.75,32.33 v1(33.75,33.82)
RSTOUTN_R: R49.1 R51.1 U1.H19 | length 19.3
  L1 w0.1: U1.H19@22.5,24.8 22.9,25.2 23.496,25.2 23.696,25.4 23.696,27.4 23.496,27.6 23.1,27.6 22.9,27.8 22.9,29 23.1,29.2 25.9,29.2 26.1,29.4 v2(26.1,30) ; v2(30.975,32.97) R51.1@31.575,32.97 31.575,32.505 31.75,32.33 32.375,32.33 32.575,32.13 R49.1@32.575,31.67
  L2 w0.1: v2(26.1,30) v3(26.5,30) ; v2(30.975,32.97) v3(30.975,33.37)
  L3 w0.1: v3(26.5,30) 26.7,29.8 27.72,29.8 30.975,33.055 v3(30.975,33.37)
RTC_XTALI: C85.1 R54.1 U1.D9 Y2.1 | length 7.9
  L1 w0.1: C85.1@15.1,20.2 15.1,19.8 14.925,19.625 Y2.1@14.925,18.7 15.1,18.525 15.1,17 R54.1@15.2,16.9 15.37,16.9 15.67,17.2 18.9,17.2 U1.D9@19.3,16.8
RTC_XTALO: C86.1 R54.2 U1.C9 Y2.2 | length 8.4
  L1 w0.1: C86.1@13.9,20.2 13.9,20 13.9,19.5 13.675,19.275 13.475,19.075 Y2.2@13.475,18.7 13.475,18.325 13.675,18.125 14.2,17.6 R54.2@14.2,16.9 14.7,16.4 18.1,16.4 U1.C9@18.5,16.8
SATA_C_RX_N: C69.1 U1.A14 | length 19.7
  L1 w0.09: v2(16.5,21.2) U1.A14@16.9,20.8 ; v1@17.2,9.392 17.425,9.167 17.425,8.818 17.693,8.55 18.25,8.55 18.75,9.05 19.446,9.05 19.55,8.946 19.55,8.75 C69.1@19.2,8.4
  L2 w0.1: v2(16.5,21.2) v3(16.8,20.9)
  L3 w0.085: v3(16.8,20.9) v4(17.1,20.6)
  L10 w0.085: v4(17.1,20.6) 17.17,20.6 17.37,20.4 17.37,20.234 17.686,19.918 18.698,19.918 18.748,19.968 19.3,19.968 19.6,19.668 19.6,18.016 17.92,16.336 17.92,15.7 17.452,15.233 17.452,13.732 17.668,13.517 17.668,13.048 17.452,12.833 17.452,10.6 17.347,10.495 17.347,9.601 17.2,9.454 v1(17.2,9.4)
SATA_C_RX_P: C70.1 U1.B14 | length 19.7
  L1 w0.09: v2(17.3,21.2) U1.B14@17.7,20.8 ; v1(17.8,9.4) 17.675,9.275 17.675,8.921 17.796,8.8 18.146,8.8 18.646,9.3 19.55,9.3 19.8,9.05 19.8,8.8 C70.1@20.2,8.4
  L2 w0.1: v2(17.3,21.2) v3(17.6,20.9)
  L3 w0.085: v3(17.6,20.9) v4(17.9,20.6)
  L10 w0.085: v1(17.8,9.4) 17.8,9.454 17.627,9.627 17.627,10.379 17.732,10.484 17.732,12.717 17.948,12.932 17.948,13.633 17.732,13.848 17.732,15.117 18.2,15.584 18.2,16.22 19.88,17.9 19.88,19.783 19.416,20.248 18.632,20.248 18.582,20.198 17.802,20.198 17.65,20.35 17.65,20.45 17.8,20.6 v4(17.9,20.6)
SATA_C_TX_N: C71.1 U1.B12 | length 25.7
  L1 w0.09: v1(15.4,3.5) 15.55,3.65 15.996,3.65 16.3,3.346 16.3,2 16.6,1.7 17.1,1.7 C71.1@17.5,1.3 ; v4(17.3,18.8) U1.B12@17.7,19.2
  L2 w0.1: v4(17.3,18.8) v3(17.6,19.1)
  L3 w0.085: v4(17.3,18.8) v3(17.6,19.1)
  L10 w0.085: v1(15.4,3.5) 14.731,3.5 14.468,3.763 14.468,7.463 15.42,8.416 15.42,8.636 16.368,9.583 16.368,12.668 16.468,12.768 16.468,15.683 17,16.216 17,16.896 17.55,17.446 17.55,17.546 17.34,17.756 17.34,17.896 17.45,18.006 17.59,18.006 17.8,17.796 17.9,17.796 18.2,18.096 18.2,18.6 17.5,19.3 17.1,19.3 16.963,19.163 16.963,18.896 17.058,18.8 v4(17.3,18.8)
  other v2: 17.3,18.8
SATA_C_TX_P: C72.1 U1.A12 | length 25.7
  L1 w0.09: v1(15.4,4.1) 15.408,4.1 15.608,3.9 16.1,3.9 16.55,3.45 16.55,2.104 16.704,1.95 17.15,1.95 C72.1@17.5,2.3 ; v2(16.5,18.8) U1.A12@16.9,19.2
  L2 w0.1: v2(16.5,18.8) v3(16.8,19.1)
  L3 w0.085: v2(16.5,18.8) v3(16.8,19.1)
  L10 w0.085: v1(15.4,4.1) 15.346,4.1 15.026,3.78 14.847,3.78 14.748,3.879 14.748,4.448 14.8,4.5 14.9,4.5 15,4.6 15,4.7 14.9,4.8 14.8,4.8 14.748,4.852 14.748,7.348 15.7,8.3 15.7,8.52 16.648,9.467 16.648,12.552 16.748,12.652 16.748,15.567 17.28,16.1 17.28,16.78 18.48,17.98 18.48,18.716 17.616,19.58 16.984,19.58 16.683,19.278 16.683,18.983 v2(16.5,18.8)
  other v4: 16.5,18.8
SATA_REXT: R20.2 U1.C14 | length 2.2
  L1 w0.2: v1(18.1,22) 18.1,21.2 U1.C14@18.5,20.8
  L12 w0.3: R20.2@17.7,22.7 17.7,22.4 v1(18.1,22)
SATA_RX_N: C69.2 J2.58 | length 6
  L1 w0.09: C69.2@19.2,7.4 19.575,7.025 19.575,5.825 20.157,5.243 21.043,5.243 21.3,5.5 21.3,6.22 v1(21.313,6.233)
  L12 w0.09: J2.58@21.25,7.67 21.25,6.295 v1(21.313,6.233)
SATA_RX_P: C70.2 J2.60 | length 6
  L1 w0.09: C70.2@20.2,7.4 19.825,7.025 19.825,6.675 19.9,6.6 20.175,6.6 20.275,6.5 20.275,6.4 20.175,6.3 19.9,6.3 19.825,6.225 19.825,5.929 20.261,5.493 20.939,5.493 21.05,5.604 21.05,5.87 v1(20.688,6.233)
  L12 w0.09: v1(20.688,6.233) 20.75,6.295 20.75,6.4 J2.60@20.75,7.67
SATA_TX_N: C71.2 J2.57 | length 7.2
  L1 w0.09: C71.2@18.5,1.3 18.9,1.7 19.2,1.7 19.75,2.25 19.75,3 20.05,3.3 21,3.3 21.263,3.563 21.263,4.17 v1(21.313,4.22)
  L12 w0.09: J2.57@21.25,1.93 21.25,3.2 21.125,3.325 21.125,4.032 v1(21.313,4.22)
SATA_TX_P: C72.2 J2.59 | length 7.3
  L1 w0.09: C72.2@18.5,2.3 18.85,1.95 19.096,1.95 19.5,2.354 19.5,3.104 19.946,3.55 20.25,3.55 20.325,3.625 20.325,3.725 20.4,3.8 20.55,3.8 20.625,3.725 20.625,3.625 20.7,3.55 20.896,3.55 21.013,3.666 21.013,3.912 v1@20.704,4.22 ; v1(20.688,4.22) v1@20.704,4.22 ; v1@20.7,4.224 v1@20.704,4.22
  L12 w0.09: v1(20.688,4.22) 20.875,4.033 20.875,3.325 20.75,3.2 J2.59@20.75,1.93
SD2_ACT: J2.11 U1.T3 | length 19.9
  L1 w0.1: v2(28.5,12.4) U1.T3@28.9,12
  L2 w0.1: v2(28.5,12.4) v3(28.8,12.7)
  L3 w0.1: v3(28.8,12.7) 28.8,13 29.15,13.35 30.75,13.35 31.275,12.825 31.275,11.988 30.915,11.628 30.915,9.685 31.438,9.162 31.438,8.86 31.605,8.692 32.425,8.692 32.675,8.442 32.675,8.185 35,5.86 35,4 34.7,3.7 33.3,3.7 v1(32.9,4.1)
  L12 w0.1: J2.11@32.75,1.93 32.75,3.7 32.9,3.85 v1(32.9,4.1)
SD2_CD: J2.38 R42.1 U1.F16 | length 42.1
  L1 w0.1: v4(20.5,22) U1.F16@20.9,22.4
  L2 w0.1: v4(20.5,22) v3(20.8,22.3)
  L3 w0.1: v4(12.3,7.7) 12.3,8.13 12.77,8.6 14.75,8.6 16.275,7.075 16.755,7.075 17.325,6.505 17.325,6.262 17.662,5.925 18.508,5.925 19.333,6.75 21.8,6.75 22.6,5.95 25.606,5.95 v4(25.969,5.587) ; v4(20.5,22) v3(20.8,22.3)
  L10 w0.1: v4(12.3,7.7) v6(12.3,8.1) 12.3,8.93 12.775,9.405 12.775,9.705 13.145,10.075 13.375,10.075 14.2,10.9 14.2,13.017 14.3,13.117 14.3,14.7 14.2,14.8 14.2,16.354 14.4,16.554 14.4,17.37 14.325,17.445 14.325,17.896 15.019,18.59 15.019,20.532 15.787,21.3 16.113,21.3 16.475,21.662 16.475,22.175 16.9,22.6 19.158,22.6 19.533,22.225 20.275,22.225 v4(20.5,22) ; v4(25.969,5.587) 26.25,5.867 v6(26.25,5.967)
  L11 w0.1: v4(12.3,7.7) v6(12.3,8.1) ; v6(26.25,5.967) v5@26.25,6.368
  L12 w0.1: R42.1@12.3,7.1 v4(12.3,7.7) ; v5(26.25,6.358) J2.38@26.25,7.67
  other v2: 20.5,22
  other v5: 12.3,7.7
SD2_CLK: J2.36 R66.2 | length 49
  L3 w0.1: v4(10.5,12.9) 10.5,13.3 11.2,14 12.1,14 12.25,13.85 12.25,13.6 12.1,13.45 11.4,13.45 11,13.05 11,12.1 11.15,11.95 11.4,11.95 11.55,12.1 11.55,12.85 11.7,13 11.95,13 12.1,12.85 12.1,12.1 12.25,11.95 12.5,11.95 12.65,12.1 12.65,12.85 12.8,13 13.05,13 13.2,12.85 13.2,11.97 13.445,11.725 13.775,11.725 14.02,11.97 14.02,13.15 14.17,13.3 14.42,13.3 14.57,13.15 14.57,12.17 14.72,12.02 14.97,12.02 15.12,12.17 15.12,13.15 15.27,13.3 15.52,13.3 15.67,13.15 15.67,11.445 15.5,11.275 15.5,11 16.4,10.1 20.2,10.1 21.567,8.733 22.267,8.733 23.357,7.642 25.242,7.642 25.342,7.742 25.342,7.967 25.492,8.117 25.743,8.117 25.892,7.967 25.892,7.642 26.042,7.493 26.555,7.493 v4(26.75,7.298)
  L10 w0.1: v4(10.5,12.9) 10.7,13.1 10.7,17.384 10.875,17.559 10.875,17.925 10.7,18.1 10.7,18.7 11.7,19.7 11.7,20 11.875,20.175 11.875,23.075 12.125,23.325 12.5,23.325 12.95,23.775 12.95,24.25 v6(12.8,24.4) ; v6(26.75,6.758) v4(26.75,7.298)
  L11 w0.1: v5(12.8,24) v6(12.8,24.4) ; v5(26.75,6.358) v6(26.75,6.758)
  L12 w0.1: v5(12.8,24) R66.2@12.8,24.5 ; v5(26.75,6.358) J2.36@26.75,7.67
SD2_CLK_R: R66.1 U1.C21 | length 8.1
  L1 w0.1: v2(18.1,26) U1.C21@18.5,26.4
  L2 w0.1: v2(18.1,26) v3(18.4,26.3)
  L3 w0.1: v3(18.4,26.3) v4(18.7,26.6)
  L10 w0.1: v6(13.1,26.3) 14.575,26.3 14.7,26.425 18.525,26.425 v4(18.7,26.6)
  L11 w0.1: v5(12.8,26) v6(13.1,26.3)
  L12 w0.1: R66.1@12.8,25.5 v5(12.8,26)
SD2_CMD: J2.21 R41.1 R52.2 | length 49.7
  L3 w0.1: v4(8.9,6) 8.9,3.27 9.67,2.5 10,2.5 11,1.5 15.5,1.5 15.882,1.118 29.91,1.118 v4(30.25,1.458)
  L10 w0.1: v6(8.9,5.6) v4(8.9,6) 8.9,6.37 8.725,6.545 8.725,9.825 11.125,12.225 11.125,18.455 12.125,19.455 12.125,19.755 12.375,20.005 12.375,22.575 v6(13.8,24) ; v6(30.25,1.018) v4(30.25,1.458)
  L11 w0.1: v6(8.9,5.6) v5(9.3,5.6) ; v6(13.8,24) v5(14.2,24) ; v5(30.25,0.617) v6(30.25,1.018)
  L12 w0.1: v5(9.3,5.6) R41.1@9.9,5.6 ; v5(14.2,24) R52.2@14.2,24.5 ; v5(30.25,0.617) J2.21@30.25,1.93
SD2_CMD_R: R52.1 U1.F19 | length 8.6
  L1 w0.1: v2(20.5,25.2) U1.F19@20.9,24.8
  L2 w0.1: v2(20.5,25.2) 20.7,25 v3(20.9,25)
  L3 w0.1: v4(20.7,25.4) 20.7,25.2 v3(20.9,25)
  L10 w0.1: v6(14.8,25.9) 16.8,25.9 17.1,25.6 20.5,25.6 v4(20.7,25.4)
  L11 w0.1: v5(14.8,25.5) v6(14.8,25.9)
  L12 w0.1: R52.1@14.2,25.5 v5(14.8,25.5)
SD2_DATA0: J2.26 U1.A22 | length 56.9
  L1 w0.1: v4(16.4,27.2) U1.A22@16.9,27.2
  L2 w0.1: v4(16.4,27.2) v3(16.8,27.2)
  L3 w0.1: v4(9.4,11.1) 9.4,10.5 9,10.1 8.6,10.1 8.45,9.95 8.45,9.7 8.6,9.55 8.75,9.55 8.9,9.4 8.9,9.15 8.75,9 8.6,9 8.45,8.85 8.45,8.6 8.6,8.45 9.45,8.45 9.7,8.7 9.7,9.2 9.85,9.35 10.1,9.35 10.25,9.2 10.25,9.02 10.4,8.87 10.67,8.87 12.2,10.4 14.5,10.4 15.925,8.975 15.925,8.445 16.145,8.225 16.742,8.225 17.017,8.5 18.627,8.5 19.527,7.6 21.949,7.6 22.849,6.7 26.057,6.7 26.457,6.3 27.381,6.3 27.863,5.818 28.38,5.818 28.743,6.18 v4(29.188,6.18) ; v4(16.4,27.2) v3(16.8,27.2)
  L10 w0.1: v4(9.4,11.1) 9.2,11.3 8.4,11.3 8.225,11.475 8.225,11.855 8.47,12.1 8.7,12.1 8.925,12.325 8.925,12.755 9.65,13.48 9.65,14.737 9.9,14.987 9.9,15.483 9.625,15.758 9.625,18.892 10.625,19.892 10.625,24.358 10.85,24.583 10.85,25.25 12.7,27.1 14.184,27.1 14.334,27.25 14.334,27.6 14.484,27.75 14.734,27.75 14.884,27.6 14.884,27.25 15.009,27.125 15.575,27.125 15.7,27.25 15.7,27.6 15.85,27.75 16.1,27.75 16.25,27.6 16.25,27.35 v4(16.4,27.2) ; v4(29.188,6.18) 29.25,6.242 v6(29.25,6.758)
  L11 w0.1: v5(29.25,6.358) v6(29.25,6.758)
  L12 w0.1: v5(29.25,6.358) J2.26@29.25,7.67
  other v2: 16.4,27.2
SD2_DATA1: J2.23 U1.E20 | length 57
  L1 w0.1: v2(19.7,25.2) U1.E20@20.1,25.6
  L2 w0.1: v2(19.7,25.2) v3(20,24.9)
  L3 w0.1: v4(12.2,5) 12.1,5.1 11.45,5.1 11.3,4.95 11.3,4.7 11.45,4.55 12.25,4.55 12.4,4.4 12.4,3.8 12.2,3.6 12.2,3.3 12.4,3.1 12.9,3.1 13.1,2.9 13.1,2.7 12.9,2.5 12.9,2.2 13.1,2 15.9,2 16.135,1.765 19.331,1.765 19.866,2.3 20.219,2.3 20.804,1.715 22.784,1.715 22.969,1.9 25.231,1.9 25.531,1.6 28.383,1.6 28.658,1.875 29.005,1.875 29.38,1.5 29.6,1.5 29.7,1.6 v4(29.7,2) ; v3(20,24.9) v4(20.3,24.6)
  L10 w0.1: v4(12.2,5) 12.4,5 12.6,5.2 12.6,5.875 12.425,6.05 12.425,6.708 11.208,7.925 11.208,9.504 13.025,11.321 13.025,16.308 13.225,16.508 13.225,17.075 13.375,17.225 13.525,17.225 13.675,17.375 13.675,18.195 14.319,18.839 14.319,20.802 14.7,21.183 14.7,21.93 15.47,22.7 15.7,22.7 16.225,23.225 19.925,23.225 20.125,23.425 20.125,24.075 19.975,24.225 19.7,24.225 19.45,24.475 19.45,25.1 19.6,25.25 20.15,25.25 20.3,25.1 v4(20.3,24.6) ; v4(29.7,2) 29.75,1.95 v6(29.75,1.018)
  L11 w0.1: v5(29.75,0.617) v6(29.75,1.018)
  L12 w0.1: v5(29.75,0.617) J2.23@29.75,1.93
SD2_DATA2: J2.28 U1.A23 | length 56.9
  L1 w0.1: v2(16.4,28) U1.A23@16.9,28
  L2 w0.1: v2(16.4,28) v3(16.8,28)
  L3 w0.1: v4@8.3,12.4 8.43,12.4 8.975,11.855 8.975,10.625 8.825,10.475 8.375,10.475 8.125,10.225 8.125,8.175 8.375,7.925 8.625,7.925 8.925,8.225 9.175,8.225 9.475,7.925 9.725,7.925 9.875,8.075 9.875,8.275 10.1,8.5 10.77,8.5 12.395,10.125 14.375,10.125 15.675,8.825 15.675,8.412 16.062,8.025 16.825,8.025 17.1,8.3 18.494,8.3 19.444,7.35 21.866,7.35 22.766,6.45 25.969,6.45 26.369,6.05 27.348,6.05 27.78,5.618 v4(28.75,5.618) ; v2(16.4,28) v3(16.8,28)
  L10 w0.1: v4@8.3,12.4 8.3,12.413 9.4,13.513 9.4,14.77 9.7,15.07 9.7,15.4 9.375,15.725 9.375,18.975 10.375,19.975 10.375,24.491 10.6,24.716 10.6,25.383 13.067,27.85 13.4,27.85 13.55,27.7 13.55,27.475 13.7,27.325 13.95,27.325 14.1,27.475 14.1,28.3 14.25,28.45 14.6,28.45 14.75,28.3 14.75,28.075 14.9,27.925 15.15,27.925 15.3,28.075 15.3,28.3 15.45,28.45 15.7,28.45 16.15,28 v2(16.4,28) ; v4(28.75,5.618) v6(28.75,6.758)
  L11 w0.1: v5(28.75,6.358) v6(28.75,6.758)
  L12 w0.1: v5(28.75,6.358) J2.28@28.75,7.67
  other v4: 8.3,12.5 16.4,28
SD2_DATA3: J2.25 U1.B22 | length 56.9
  L1 w0.1: v2(17.3,27.6) U1.B22@17.7,27.2
  L2 w0.1: v2(17.3,27.6) v3(17.6,27.3)
  L3 w0.1: v4(13,3.9) 13,3.7 14.3,2.4 16.083,2.4 16.218,2.265 19.265,2.265 19.7,2.7 20.397,2.7 20.982,2.115 22.518,2.115 22.803,2.4 25.397,2.4 25.797,2 27.4,2 27.8,2.4 v4(28.9,2.4) ; v3(17.6,27.3) v4(18,27.3)
  L10 w0.1: v4(13,3.9) 12.885,4.015 12.885,5.985 12.675,6.195 12.675,6.791 11.425,8.041 11.425,9.438 13.225,11.238 13.225,16.225 13.42,16.42 13.7,16.42 13.975,16.695 13.975,17.005 13.9,17.08 13.9,18.137 14.519,18.756 14.519,20.598 15.525,21.604 15.525,22.055 16.47,23 19.983,23 20.208,23.225 20.655,23.225 20.9,23.47 20.9,24.587 21.375,25.062 21.375,25.725 19.875,27.225 19.475,27.225 19.3,27.4 19.3,27.8 19.1,28 17.9,28 17.7,27.8 17.7,27.6 v4(18,27.3) ; v4(28.9,2.4) 29.25,2.05 v6(29.25,1.017)
  L11 w0.1: v5(29.25,0.617) v6(29.25,1.017)
  L12 w0.1: v5(29.25,0.617) J2.25@29.25,1.93
SD2_DATA4: J2.30 U1.A19 | length 56.9
  L1 w0.1: U1.A19@16.9,24.8 v2(17.3,25.2)
  L2 w0.1: v3(16.9,25.2) v2(17.3,25.2)
  L3 w0.1: v4(9.5,12.8) 9,12.8 8.85,12.65 8.85,12.4 9,12.25 9.35,12.25 9.5,12.1 9.5,11.7 9.8,11.4 9.8,10.1 9.95,9.95 10.2,9.95 10.35,10.1 10.35,10.35 10.5,10.5 10.75,10.5 10.9,10.35 10.9,10.1 11.05,9.95 11.3,9.95 12,10.65 14.68,10.65 16.355,8.975 16.455,8.975 16.73,8.7 19.21,8.7 19.36,8.55 19.36,8.1 19.51,7.95 19.76,7.95 19.91,8.1 19.91,8.55 20.06,8.7 20.31,8.7 20.46,8.55 20.46,8.1 20.71,7.85 22.031,7.85 22.931,6.95 26.135,6.95 26.535,6.55 27.564,6.55 27.896,6.218 v4(28.25,6.218) ; v4(16.6,25.5) v3(16.9,25.2)
  L10 w0.1: v4(9.5,12.8) 9.5,11.77 9.745,11.525 10.055,11.525 10.3,11.77 10.3,12.5 10.125,12.675 10.125,14.646 10.3,14.821 10.3,15.7 10.125,15.875 10.125,18.726 11.125,19.726 11.125,24.055 11.35,24.28 11.35,24.9 11.5,25.05 11.75,25.05 11.9,24.9 11.9,23.9 12.05,23.75 12.3,23.75 12.45,23.9 12.45,25.725 12.6,25.875 12.85,25.875 13,25.725 13,24.925 13.15,24.775 13.4,24.775 13.55,24.925 13.55,25.3 13.7,25.45 13.95,25.45 14.1,25.3 14.1,24.925 14.25,24.775 14.5,24.775 14.65,24.925 14.65,25.047 15.178,25.575 16.525,25.575 v4(16.6,25.5) ; v4(28.25,6.218) v6(28.25,6.758)
  L11 w0.1: v5(28.25,6.358) v6(28.25,6.758)
  L12 w0.1: v5(28.25,6.358) J2.30@28.25,7.67
SD2_DATA5: J2.27 U1.B18 | length 57
  L1 w0.1: v2(17.3,24.4) U1.B18@17.7,24
  L2 w0.1: v3(17,24.1) v2(17.3,24.4)
  L3 w0.1: v4(11.5,5.6) 11.5,5.5 11.25,5.25 11.05,5.25 10.55,5.75 10.1,5.75 9.95,5.6 9.95,5.35 10.25,5.05 10.25,4.8 9.95,4.5 9.95,4.25 10.1,4.1 10.688,4.1 10.888,4.3 11.8,4.3 11.97,4.13 11.97,3.62 11.8,3.45 10.15,3.45 10,3.3 10,3.05 10.15,2.9 12.55,2.9 12.7,2.75 12.7,2.5 12.55,2.35 11.3,2.35 11.15,2.2 11.15,1.95 11.3,1.8 15.8,1.8 16.085,1.515 22.917,1.515 23.052,1.65 ; v4(16.6,24.1) v3(17,24.1) ; 23.084,1.65 25.148,1.65 25.398,1.4 28.75,1.4 v4(28.85,1.5)
  L10 w0.1: v4(11.5,5.6) 11.5,6.125 11.425,6.2 11.425,7.025 10.775,7.675 10.775,9.675 12.625,11.525 12.625,16.533 12.725,16.633 12.725,17.838 13.919,19.032 13.919,21.119 14.3,21.5 14.3,22.096 15.304,23.1 15.534,23.1 16.1,23.666 16.466,23.666 16.6,23.8 v4(16.6,24.1) ; v6(28.75,1.017) 28.75,1.4 v4(28.85,1.5)
  L11 w0.1: v5(28.75,0.617) v6(28.75,1.017)
  L12 w0.1: v5(28.75,0.617) J2.27@28.75,1.93
SD2_DATA6: J2.32 U1.E17 | length 56.9
  L1 w0.1: U1.E17@20.1,23.2 v2(20.5,22.8)
  L2 w0.1: v2(20.5,22.8) v3(20.8,23.1)
  L3 w0.1: v4(9.9,11.9) 10.2,11.6 10.2,11 10.35,10.85 10.6,10.85 10.75,11 10.75,11.35 10.9,11.5 11.15,11.5 11.3,11.35 11.3,11 11.45,10.85 11.7,10.85 11.85,11 11.85,11.35 12,11.5 12.25,11.5 12.4,11.35 12.4,11.1 12.575,10.925 14.788,10.925 16.813,8.9 18.5,8.9 18.6,9 20.293,9 21.193,8.1 22.114,8.1 23.014,7.2 26.218,7.2 26.618,6.8 27.352,6.8 v4(27.75,7.198) ; v4(20.5,23.6) 20.5,23.4 v3(20.8,23.1)
  L10 w0.1: v4(9.9,11.9) 9.9,14.704 10.1,14.904 10.1,15.566 9.875,15.791 9.875,18.809 10.875,19.809 10.875,24.225 11.1,24.45 11.1,25.1 12.825,26.825 16.689,26.825 16.82,26.955 16.82,27.725 16.945,27.85 17.195,27.85 17.32,27.725 17.32,26.955 17.45,26.825 18.395,26.825 18.575,27.005 18.575,27.475 18.725,27.625 18.975,27.625 19.1,27.5 19.1,26.6 19.275,26.425 20.275,26.425 21.175,25.525 21.175,25.145 20.675,24.645 20.675,24.4 20.5,24.225 v4(20.5,23.6) ; v6(27.75,6.758) v4(27.75,7.198) v4@27.75,7.298
  L11 w0.1: v5(27.75,6.358) v6(27.75,6.758)
  L12 w0.1: v5(27.75,6.358) J2.32@27.75,7.67
SD2_DATA7: J2.29 U1.C18 | length 56.9
  L1 w0.1: v4(18.1,23.6) U1.C18@18.5,24
  L2 w0.1: v4(18.1,23.6) v3(18.4,23.9)
  L3 w0.1: v4(11.2,3.9) 10,3.9 9.675,4.225 9.675,5.7 9.975,6 10.5,6 10.7,6.2 11.3,6.2 11.5,6 11.8,6 12.5,5.3 12.95,5.3 13.15,5.1 13.15,4.9 12.625,4.375 12.625,3.675 14.1,2.2 16,2.2 16.185,2.015 19.298,2.015 19.783,2.5 20.314,2.5 20.899,1.915 22.651,1.915 22.886,2.15 25.314,2.15 25.664,1.8 26,1.8 28.05,1.8 v4(28.25,2) ; v4(18.1,23.6) v3(18.4,23.9)
  L10 w0.1: v4(11.2,3.9) 12.2,3.9 12.35,4.05 12.35,4.3 12.2,4.45 11.575,4.45 11.325,4.7 11.325,4.895 12.175,5.745 12.175,6.558 10.992,7.741 10.992,9.571 12.825,11.404 12.825,16.45 12.925,16.55 12.925,17.755 14.119,18.949 14.119,20.885 14.5,21.266 14.5,22.013 15.387,22.9 15.617,22.9 16.142,23.425 16.595,23.425 17.145,23.975 17.455,23.975 17.83,23.6 v4(18.1,23.6) ; v6(28.25,1.018) v4(28.25,2)
  L11 w0.1: v5(28.25,0.617) v6(28.25,1.018)
  L12 w0.1: v5(28.25,0.617) J2.29@28.25,1.93
  other v2: 18.1,23.6
SD2_WP: J2.34 R43.1 U1.D17 | length 43
  L1 w0.1: U1.D17@19.3,23.2 v2(19.7,22.8)
  L2 w0.1: v3(19.4,23.1) v2(19.7,22.8)
  L3 w0.1: v4(11.8,8.8) 12.13,8.8 12.705,9.375 13.095,9.375 13.47,9 14.683,9 16.383,7.3 16.813,7.3 17.525,6.588 17.525,6.345 17.745,6.125 18.325,6.125 19.2,7 21.883,7 22.683,6.2 25.886,6.2 26.286,5.8 26.967,5.8 v4(27.25,5.518) ; v3(19.4,23.1) 19.4,22.9 v4(19.7,22.6)
  L10 w0.1: v5(11.8,8.9) v6(11.8,9.3) 12.025,9.525 12.025,9.755 12.67,10.4 13.3,10.4 13.975,11.075 13.975,13.075 14.1,13.2 14.1,14.617 13.975,14.742 13.975,16.412 14.2,16.637 14.2,17.287 14.125,17.362 14.125,17.979 14.819,18.673 14.819,20.615 15.704,21.5 16.03,21.5 16.275,21.745 16.275,22.375 16.7,22.8 19.5,22.8 v4(19.7,22.6) ; v4(27.25,5.518) v6(27.25,5.957)
  L11 w0.1: v5(11.8,8.9) v6(11.8,9.3) ; v6(27.25,5.957) v5(27.25,6.358)
  L12 w0.1: v5(11.8,8.9) 12.1,8.9 12.3,8.7 R43.1@12.3,8.3 ; v5(27.25,6.358) J2.34@27.25,7.67
SD3_CD: J1.34 R39.1 U1.A18 | length 48.6
  L1 w0.1: v2(16.5,23.6) U1.A18@16.9,24 ; v2(28.7,37.9) R39.1@28.7,38.5
  L2 w0.1: v3(16.1,23.6) v2(16.5,23.6) ; v3(28.3,37.9) v2(28.7,37.9)
  L3 w0.1: v4(6.2,31.8) 5.9,31.5 5.9,30.3 6.5,29.7 6.5,29.3 6.2,29 6.2,28 7.1,27.1 7.1,26.6 7.575,26.125 8.745,26.125 11.345,23.525 11.562,23.525 11.973,23.115 14.5,23.115 14.985,23.6 v3(16.1,23.6) ; v4(12.2,36.6) 12.87,36.6 13.545,35.925 14.055,35.925 15.125,36.995 15.125,37.255 15.345,37.475 15.942,37.475 16.592,36.825 17.134,36.825 17.384,36.575 18.78,36.575 19.301,37.096 20.266,37.096 20.47,37.3 23.661,37.3 24.261,37.9 24.6,37.9 25.085,38.385 25.9,38.385 26.342,37.943 v4(27.25,37.943) 28.258,37.943 v3(28.3,37.9)
  L10 w0.1: v4(6.2,31.8) 6.2,32.1 6.6,32.5 6.6,32.9 7.9,34.2 8.3,34.2 9.7,35.6 11.63,35.6 12.2,36.17 v4(12.2,36.6) ; v4(27.25,37.943) v6(27.25,38.982)
  L11 w0.1: v6(27.25,38.982) v5(27.25,39.383)
  L12 w0.1: J1.34@27.25,38.07 v5(27.25,39.383)
SD3_CLK: J1.27 R50.2 | length 45.6
  L1 w0.1: v2(11.2,21.6) 12,21.6 R50.2@12.4,21.2
  L2 w0.1: v3(10.8,21.6) v2(11.2,21.6)
  L3 w0.1: v4(4.9,26.1) 4.9,25.37 5.37,24.9 6.43,24.9 7.13,24.2 8.63,24.2 9.2,23.63 9.2,22.6 8.84,22.24 8.84,21.917 9.017,21.74 9.26,21.74 9.48,21.96 9.723,21.96 9.9,21.783 9.9,21.54 9.68,21.32 9.68,21.077 9.857,20.9 10.1,20.9 v3(10.8,21.6) ; v4(14.1,33.7) 14.275,33.525 15,33.525 15.125,33.4 17.5,33.4 18.4,32.5 19.07,32.5 19.345,32.225 19.855,32.225 20.08,32 23.8,32 23.95,32.15 25.45,32.15 25.9,31.7 27.892,31.7 v4(28.75,32.558)
  L10 w0.1: v4(4.9,26.1) 5.2,26.4 5.2,26.9 6.2,27.9 7.03,27.9 8.4,29.27 8.6,29.27 10.53,31.2 11.3,31.2 11.45,31.35 11.45,32 11.7,32.25 13.45,32.25 13.7,32.5 13.7,32.7 13.475,32.925 13.475,33.375 13.8,33.7 v4(14.1,33.7) ; v6(28.75,31.418) v4(28.75,32.558)
  L11 w0.1: v5(28.75,31.017) v6(28.75,31.418)
  L12 w0.1: v5(28.75,31.017) J1.27@28.75,32.33
SD3_CLK_R: R50.1 U1.D14 | length 8
  L1 w0.1: R50.1@12.4,20.2 v2(13,20.2) ; v2(18.9,20.4) U1.D14@19.3,20.8
  L2 w0.1: v2(13,20.2) v3(13,20.6) ; v3(18.6,20.7) v2(18.9,20.4)
  L3 w0.1: v3(13,20.6) 15.37,20.6 15.745,20.975 16.45,20.975 16.66,21.185 18.115,21.185 v3(18.6,20.7)
SD3_CMD: J1.33 R1.2 R38.1 | length 47.6
  L1 w0.1: v2(11.8,23.4) R1.2@12.4,23.4 ; v1(27.25,30.82) 28.72,30.82 29.1,31.2 R38.1@29.1,31.7
  L2 w0.1: v2(11.8,23.4) v3(12.2,23.4)
  L3 w0.1: v4(6.8,28.4) 6.8,28.2 7,28 7.3,28 7.55,27.75 7.55,26.75 7.7,26.6 7.95,26.6 8.1,26.75 8.1,27.25 8.25,27.4 8.5,27.4 8.65,27.25 8.65,26.55 8.8,26.4 9.23,26.4 9.455,26.175 9.755,26.175 9.975,25.955 9.975,25.74 10.415,25.3 10.415,25.085 11.225,24.275 11.655,24.275 11.9,24.03 11.9,23.7 v3(12.2,23.4) ; v4(13.2,33.7) 13.2,32.8 13.425,32.575 14.138,32.575 14.25,32.688 14.482,32.688 14.545,32.625 14.9,32.625 15.275,33 15.57,33 15.75,32.82 15.75,32.4 15.9,32.25 16.17,32.25 16.32,32.4 16.32,32.82 16.5,33 16.7,33 17.1,32.6 17.27,32.6 17.37,32.7 17.63,32.7 18.33,32 19.6,32 19.8,31.8 20.505,31.8 20.6,31.705 24.205,31.705 24.375,31.875 25.339,31.875 25.714,31.5 27,31.5 27.25,31.25 v1(27.25,30.82)
  L10 w0.1: v4(6.8,28.4) 6.7,28.3 6.5,28.3 6.35,28.45 6.35,28.7 6.5,28.85 6.9,28.85 7.088,29.038 7.088,29.262 6.95,29.4 6.95,29.65 7.1,29.8 8.2,29.8 8.35,29.95 8.35,30.2 8.2,30.35 7.95,30.35 7.8,30.5 7.8,30.75 7.95,30.9 8.3,30.9 8.575,31.175 9.475,31.175 9.625,31.325 9.625,31.575 9.475,31.725 9.305,31.725 9.155,31.875 9.155,32.125 9.305,32.275 10.025,32.275 10.2,32.1 10.2,31.8 10.35,31.65 10.6,31.65 10.75,31.8 10.75,32.75 10.9,32.9 11.1,32.9 11.4,32.6 12.8,32.6 13.2,33 v4(13.2,33.7)
  L12 w0.101: v1(27.25,30.82) J1.33@27.25,32.33
SD3_CMD_R: R1.1 U1.B13 | length 8.4
  L1 w0.1: v2(12.4,21.8) R1.1@12.4,22.4 ; v2(17.3,20.4) U1.B13@17.7,20
  L2 w0.1: v3(12.4,21.4) v2(12.4,21.8) ; v2@17.3,20.415 v3(17.6,20.115)
  L3 w0.1: v3(12.4,21.4) 12.4,20.425 12.7,20.125 15.5,20.125 15.6,20.225 16.945,20.225 17.055,20.115 v3(17.6,20.115)
SD3_DATA0: J1.29 U1.E14 | length 53.4
  L1 w0.1: v2(19.7,20.4) U1.E14@20.1,20.8
  L2 w0.1: v2(19.7,20.4) v3(20,20.7)
  L3 w0.1: v4(5,28.5) 5,27.785 5.275,27.51 5.275,27.062 6.837,25.5 7.67,25.5 8.245,24.925 9.026,24.925 10.125,23.826 10.125,23.375 10.925,22.575 11.664,22.575 11.889,22.35 12.733,22.35 12.908,22.175 15.292,22.175 15.902,22.785 17.3,22.785 17.67,22.415 18.215,22.415 18.475,22.155 18.475,21.895 18.795,21.575 19.055,21.575 19.275,21.355 19.275,21.095 19.67,20.7 v3(20,20.7) ; v4(12.8,35.1) 12.8,34.85 13.25,34.4 14.075,34.4 14.25,34.575 14.9,34.575 15.225,34.25 16.337,34.25 16.562,34.475 17.411,34.475 18.711,33.175 19.738,33.175 20.283,32.63 23.433,32.63 23.653,32.85 25.317,32.85 25.552,33.085 27.992,33.085 v4(28.25,33.343)
  L10 w0.1: v4(5,28.5) 5.5,29 5.5,29.63 5.8,29.93 5.8,30.45 7,31.65 7,31.8 7.362,32.162 7.362,32.793 7.945,33.375 9.275,33.375 9.7,33.8 9.7,34.4 10.175,34.875 10.555,34.875 11.205,34.225 12.355,34.225 12.8,34.67 v4(12.8,35.1) ; v4(28.25,33.343) v6(28.25,34.043)
  L11 w0.1: v5(28.25,33.643) v6(28.25,34.043)
  L12 w0.1: J1.29@28.25,32.33 v5(28.25,33.643)
SD3_DATA1: J1.30 U1.F14 | length 53.4
  L1 w0.1: v2(20.5,20.4) U1.F14@20.9,20.8
  L2 w0.1: v2(20.5,20.4) v3(20.8,20.7)
  L3 w0.1: v4(5.5,27.9) 5.5,27.17 6.97,25.7 8.534,25.7 10.325,23.909 10.325,23.7 11.225,22.8 11.722,22.8 11.922,22.6 12.783,22.6 12.9,22.483 15.217,22.483 15.719,22.985 17.645,22.985 17.93,22.7 19.003,22.7 20.125,21.578 20.125,21.045 20.47,20.7 v3(20.8,20.7) ; v4(13.7,36.3) 14.325,36.925 14.325,37.425 14.625,37.725 16.025,37.725 16.675,37.075 17.167,37.075 17.442,36.8 18.673,36.8 19.218,37.346 20.233,37.346 20.437,37.55 23.588,37.55 24.188,38.15 24.567,38.15 25.052,38.635 26.1,38.635 26.412,38.323 27.4,38.323 27.555,38.168 28.068,38.168 28.443,38.543 v4(28.55,38.543)
  L10 w0.1: v4(5.5,27.9) 5.5,28.57 6.4,29.47 6.4,30.2 8,31.8 8.3,31.8 9.3,32.8 9.6,32.8 10.4,33.6 12.5,33.6 13.4,34.5 13.4,36 v4(13.7,36.3) ; v6(28.25,38.982) 28.55,38.682 v4(28.55,38.543)
  L11 w0.1: v6(28.25,38.982) v5(28.25,39.383)
  L12 w0.1: J1.30@28.25,38.07 v5(28.25,39.383)
SD3_DATA2: J1.31 U1.A15 | length 53.4
  L1 w0.1: v2(16.5,22) U1.A15@16.9,21.6
  L2 w0.1: v2(16.5,22) v3(16.8,21.7)
  L3 w0.1: v4(4.5,26.8) 4.871,26.8 6.571,25.1 7.434,25.1 8.034,24.5 8.886,24.5 9.6,23.786 9.6,23 10.6,22 10.817,22 11.217,21.6 11.713,21.6 11.813,21.7 12.7,21.7 13.057,21.343 13.3,21.343 13.543,21.1 15.3,21.1 15.725,21.525 16.388,21.525 16.563,21.7 v3(16.8,21.7) ; v4(12.2,34.6) 12.7,34.1 14.249,34.1 14.524,33.825 14.855,33.825 15.03,34 16.37,34 16.645,34.275 17.279,34.275 18.579,32.975 19.655,32.975 20.2,32.43 23.566,32.43 23.736,32.6 25.45,32.6 25.735,32.885 27.765,32.885 27.95,32.7 27.95,32.45 27.8,32.3 v4(27.4,32.3)
  L10 w0.1: v4(4.5,26.8) 4.3,26.8 4.15,26.95 4.15,27.18 4.32,27.35 4.85,27.35 5,27.5 5,27.75 4.85,27.9 4.3,27.9 4.15,28.05 4.15,28.28 4.3,28.43 4.48,28.43 4.625,28.575 4.625,28.755 5.2,29.33 5.2,29.67 5.575,30.045 5.575,30.645 6.7,31.77 6.7,32.1 7,32.4 7,32.85 8.05,33.9 8.3,33.9 8.5,33.7 9.2,33.7 9.4,33.9 9.4,34.9 9.7,35.2 10.7,35.2 11.3,34.6 v4(12.2,34.6) ; v4(27.4,32.3) 27.4,31.768 v6(27.75,31.418)
  L11 w0.1: v5(27.75,31.017) v6(27.75,31.418)
  L12 w0.1: v5(27.75,31.017) J1.31@27.75,32.33